# Altium PCB Knob-v1.0.PcbDoc (part 2 of 3)
Units mil, origin at the board's own origin, x right, y up, seen from the top; angles counter-clockwise.
Board outline 3346.46 x 5475.65 mil, 2 copper layers (Top Layer, Bottom Layer), stack 61.811 mil thick; 109 components, 69 nets, 369 pads, 208 vias.
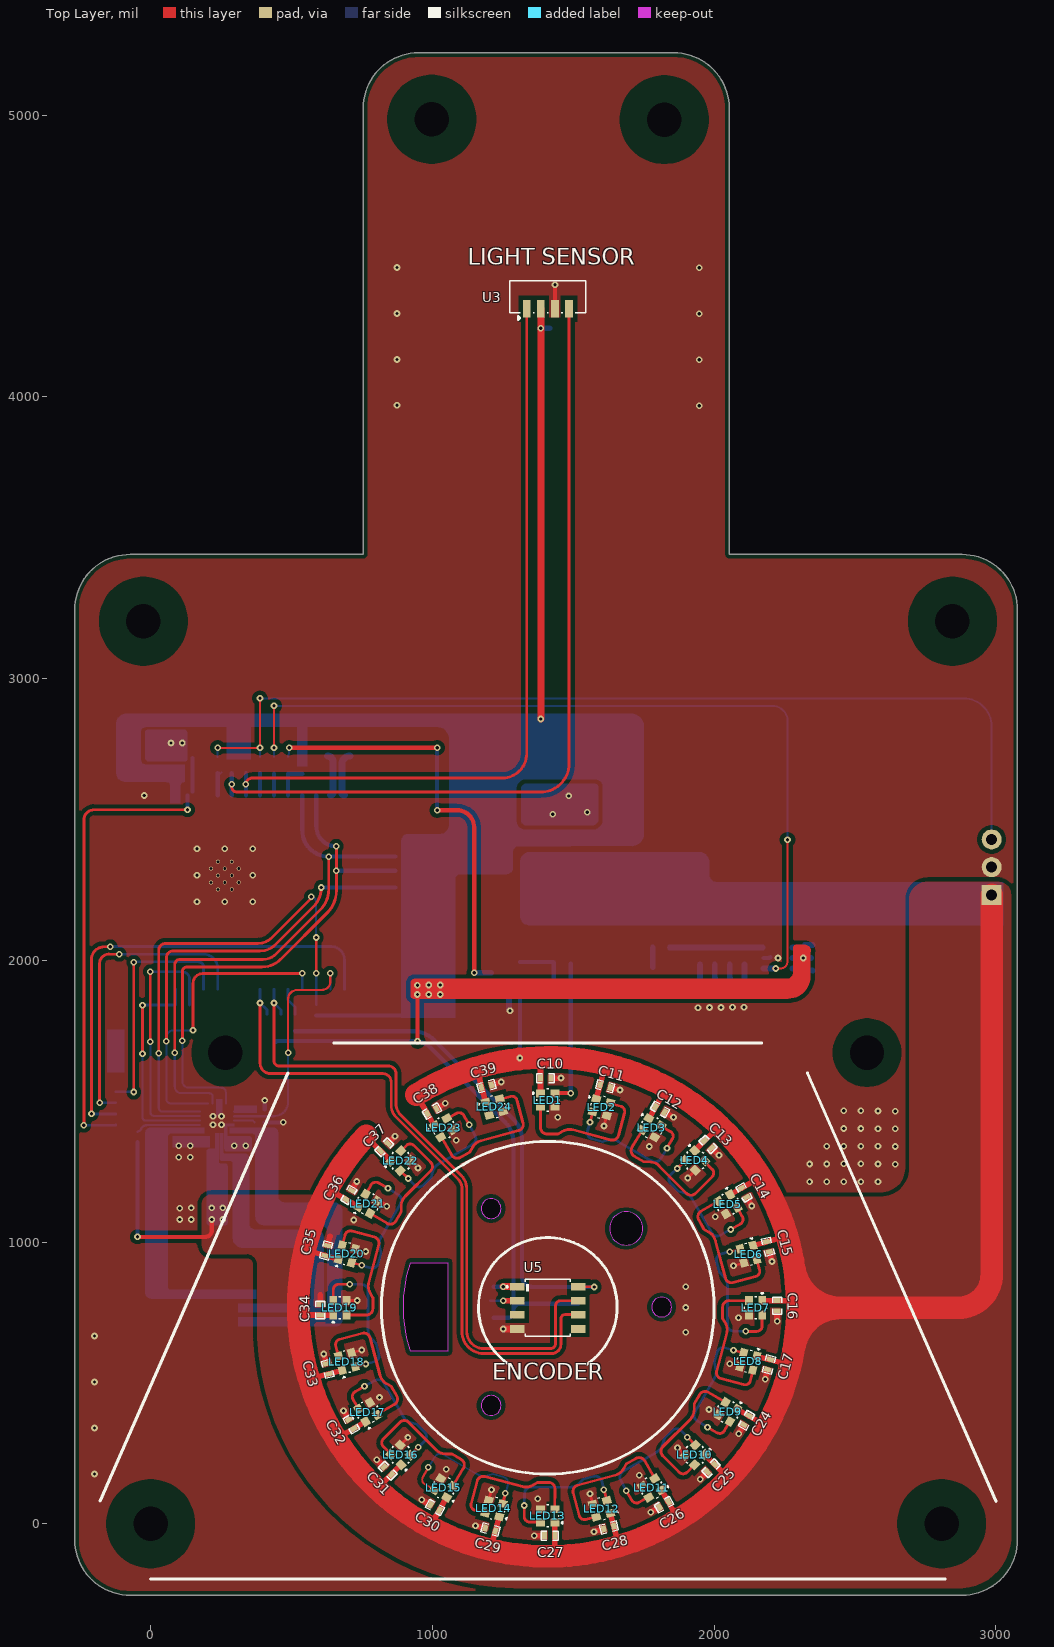
[diagram p0: Top Layer view]

## Via types
v1: diameter 23.62, hole 11.81, Top Layer to Bottom Layer, tented both sides, 208 vias

## Nets (pads, with @x,y where several pads share a name; then routed paths per layer and width w, separated by ;. In a path a pad name is that pad's centre, name@x,y a point inside that pad or via, vN(x,y) a via of type N, cw(c..) or ccw(c..) an arc to the next point about the centre after c; other vN are vias at no path point) (continued)
3V3: (continued)
  Bottom Layer w15: 445.27,1711.18 cw(c448.08,1711.18) 448.08,1713.99 935.21,1713.99 cw(c935.21,1631.23) 993.73,1689.75 1258.73,1424.75 cw(c1188.02,1354.04) 1288.02,1354.04 1288.02,821.41 ; R6.1@588.11,1804 910,1804 912,1806 ; R18.1@1218.01,731.41 1270.58,731.41 ccw(c1270.58,748.85) 1288.02,748.85 1288.02,826.41 ccw(c1273.02,826.41) 1273.02,841.41 ; C19.2@1218.01,841.41 v1(1251.42,841.41) 1273.02,841.41 ; 1288.02,758.27 cw(c1310.27,758.27) 1310.27,780.52 ; 1288.02,802.78 ccw(c1310.27,802.78) 1310.27,780.52 ; 1288.02,856.41 cw(c1273.02,856.41) 1273.02,841.41 ; R20.1@1518.32,780.52 1310.27,780.52
  Bottom Layer w20: v1(1385.28,4244.16) C8.2@1416.07,4244.16 ; U7.5@2278.66,2008.09 2311.42,2008.09 C40.1@2344.17,2008.09
  other v1: 987.89,1878.86 1028.64,1878.86 947.14,1911.61 987.89,1912.2 1028.64,1912.2 2316.42,2008.09 1385.28,2856.38
5V: C1.2 C2.2 C9.2 C10.2 C11.2 C12.2 C13.2 C14.2 C15.2 C16.2 C17.2 C18.2 C20.2 C21.2 C24.2 C25.2 C26.2 C27.2 C28.2 C29.2 C30.2 C31.2 C32.2 C33.2 C34.2 C35.2 C36.2 C37.2 C38.2 C39.2 J1.1 LED1.1 LED2.1 LED3.1 LED4.1 LED5.1 LED6.1 LED7.1 LED8.1 LED9.1 LED10.1 LED11.1 LED12.1 LED13.1 LED14.1 LED15.1 LED16.1 LED17.1 LED18.1 LED19.1 LED20.1 LED21.1 LED22.1 LED23.1 LED24.1 U1.3 U4.5 U6.18 | length 11509.7
  Top Layer w10: 1384.27,1633.68 1388.13,1637.55 1391.58,1641
  Top Layer w15: v1(-46.68,1018.16) 194.27,1018.16 ccw(c194.27,1041.16) 217.27,1041.16 v1(217.27,1079.65)
  Top Layer w20: 529.86,740.94 600.73,740.94 602.15,740.94 LED19.1@648.3,740.94 ; 552.9,969.89 618.43,952.33 621.35,951.55 LED20.1@667.29,939.24 ; 560.81,517.12 562.74,517.64 ; 566.14,514.26 633.69,532.36 634.59,532.6 LED18.1@680.54,544.91 ; 635.28,1184.69 694.46,1150.53 696.66,1149.26 LED21.1@737.85,1125.48 ; 654.76,306.54 655.44,306.94 ; 660.5,303 721.51,338.23 721.87,338.44 LED17.1@763.07,362.22 ; 768.7,1370.74 C37.2@816.01,1323.45 818.81,1320.63 LED22.1@852.45,1286.99 ; 805.3,125.79 854.85,175.34 855.41,175.9 LED16.1@889.04,209.53 ; 947.6,1515.74 982.47,1455.34 983.03,1454.37 LED23.1@1006.81,1413.17 ; 991.73,-8.95 1025.02,48.72 1027.16,52.42 LED15.1@1050.94,93.61 ; 1158.74,1610.07 1175.14,1548.83 1177.08,1541.61 LED24.1@1189.39,1495.67 ; 1206.89,-89.7 C29.2@1224.12,-25.49 1225.23,-21.25 LED14.1@1237.54,24.69 ; LED1.1@1384.27,1527.56 1384.27,1575.13 1384.27,1581.82 1384.27,1645.99 ; 1388.13,1637.55 1388.13,1645.99 ; 1435.14,-114.24 1435.14,-43.37 LED13.1@1435.14,4.19 ; LED2.1@1582.22,1507.79 1594.53,1553.73 1595.68,1558.03 1612.87,1622.18 ; LED12.1@1631.66,36.96 1643.97,-8.99 1643.99,-9.07 1662.31,-77.44 ; LED3.1@1768.63,1438.76 1792.35,1479.86 1792.41,1479.96 1827.84,1541.33 ; LED11.1@1812.95,119.31 1836.73,78.11 1837.55,76.7 1872.17,16.74 ; LED4.1@1931.13,1324.17 1964.76,1357.8 1966.1,1359.14 2014.87,1407.91 ; LED10.1@1966.93,245.71 2000.56,212.08 2002.72,209.92 2050.67,161.97 ; LED5.1@2057.31,1167.83 2097.55,1191.07 2098.5,1191.61 2159.87,1227.05 ; LED9.1@2081.91,407 2123.11,383.22 2124.29,382.54 2184.48,347.79 ; LED6.1@2138.67,987.53 2184.62,999.84 2186.78,1000.42 2253.07,1018.18 ; LED8.1@2151.35,595.05 2197.29,582.74 2199.92,582.04 2265.74,564.4 ; LED7.1@2171.23,792 2272.26,792
  Top Layer w80: 765.84,1377.87 ccw(c1409.88,769.67) 560.81,517.12 ccw(c1409.88,769.67) 654.76,306.54 ccw(c1409.88,769.67) 797.56,129.55 ccw(c1409.88,769.67) 986.82,-8.61 ccw(c1409.88,769.67) 1202.49,-91.54 ccw(c1409.88,769.67) 1428.36,-115.97 ccw(c1409.88,769.67) 1657.34,-80.89 ccw(c1409.88,769.67) 2050.08,157.44 ccw(c1409.88,769.67) 2184.52,339.99 ccw(c1409.88,769.67) 2269.41,555.43 ccw(c1409.88,769.67) 2295.7,766.41 ccw(c1409.88,769.67) 2292.38,846.33 cw(c2389.63,865.54) 2290.5,865.54 ccw(c1409.88,769.67) 2285.91,901 ; 943.29,1522.66 cw(c1409.88,769.67) 2285.91,901 ; 2285.91,631.14 cw(c2450.11,598.7) 2449.98,766.07 cw(c2450.11,933.45) 2285.91,901 ; 2446.72,766.41 2867.32,766.41 ; 2867.62,766.41 ccw(c2867.62,884.47) 2985.67,884.47 J1.1@2985.67,2232.36
  Bottom Layer w15: v1(-46.68,1018.16) -46.25,1018.16 C18.2@-46.25,1354.21 ; v1(1311.01,1653.12) C9.2@1311.01,1870.16 U4.5@1311.01,1913.76
  other v1: 256.31,1079.65 217.27,1120.98 256.31,1120.98
BLDC_U: J3.3 U6.15
BLDC_V: J3.2 U6.17
BLDC_W: J3.1 U6.1
ENC_CLK: R3.1 U2.20 U5.7 | length 2359.1
  Top Layer w10: v1(438.16,1848.68) 438.16,1642.84 ccw(c456,1642.84) 456,1625 843.89,1625 cw(c843.89,1597.89) 871,1597.89 871,1491.89 ccw(c928.87,1491.89) 887.95,1450.97 1052.85,1286.07 1102.77,1236.14 cw(c1055.57,1188.91) 1122.35,1188.91 1122.35,681.76 ccw(c1182.38,681.76) 1182.38,621.73 1420.01,621.73 ccw(c1420.01,639.08) 1437.36,639.08 1437.36,773.87 cw(c1454.91,773.87) 1454.91,791.41 U5.7@1518.12,791.41
  Bottom Layer w10: v1(438.16,1848.68) 463.03,1823.81 R3.1@463.03,1808.31 ; v1@438.16,1852.77 U2.20@438.16,1897.22
ENC_CSN: R19.2 R20.2 U5.8 | length 1808.1
  Top Layer w10: U5.8@1511.12,841.41 1511.57,840.97 1574.77,840.97 v1(1575.22,840.52)
  Bottom Layer w15: R19.2@513.02,1748.35 929.04,1748.35 929.13,1748.35 cw(c929.09,1637.21) 1007.73,1715.75 1289.03,1434.45 cw(c1218.32,1363.74) 1318.32,1363.74 1318.32,878.35 ccw(c1356.15,878.35) 1356.15,840.52 R20.2@1518.32,840.52 v1(1575.22,840.52)
ENC_DO: R9.1 U2.21 U5.6 | length 2378
  Top Layer w10: v1(388.53,1848.68) 388.53,1634.81 ccw(c425.45,1634.81) 425.45,1597.89 824.09,1597.89 cw(c824.09,1567.98) 854,1567.98 854,1484.85 ccw(c911.87,1484.85) 870.95,1443.93 ; 870.95,1443.93 1090.81,1224.07 cw(c1055.48,1188.87) 1105.35,1188.9 1105.35,1188.82 1105.35,681.24 ; 1105.35,681.19 ccw(c1182.38,681.19) 1182.38,604.16 1182.45,604.16 1423.92,604.16 ccw(c1423.92,636.67) 1456.43,636.67 1456.43,727.48 cw(c1471.11,727.48) 1471.11,742.16 1517.38,742.16 cw(c1517.38,741.41) U5.6@1518.12,741.41
  Bottom Layer w10: v1@387.84,1848.68 387.84,1897.22 U2.21@388.16,1897.22 ; v1(388.53,1848.68) 412.84,1824.37 R9.1@412.84,1808.31
ESP_EN: C7.2 J2.6 R7.1 U2.3 | length 1757.9
  Top Layer w10: v1(-237,1414) -237,2497.99 cw(c-200.54,2497.99) -200.54,2534.45 v1(131.16,2534.45)
  Bottom Layer w10: v1@-237,1414.68 -124.26,1414.68 J2.6@-123.58,1415.35
  Bottom Layer w13: U2.3@148.84,2597.98 R7.1@148.84,2664.98 C7.2@148.84,2718.48
  Bottom Layer w15: v1(131.16,2534.45) U2.3@131.16,2585.2
ESP_IO9: J2.5 U2.15 | length 1690.7
  Top Layer w10: v1(-210.04,1454.72) -210.04,2002.96 cw(c-164.89,2002.96) -164.89,2048.11 v1(-143.31,2048.11)
  Bottom Layer w10: v1(-210.04,1454.72) J2.5@-123.58,1454.72 ; v1(-143.31,2048.11) cw(c-142.41,2048.11) -142.41,2049 606.07,2049 641,2049 cw(c641,2001.84) 685.36,2017.84 cw(c641,2001.84) 688.11,2003.97 cw(c641,2001.84) 688.16,2001.84 U2.15@688.16,1897.22
GND: C1.1 C2.1 C3.1 C4.1 C5.1 C6.1 C7.1 C8.1 C9.1 C10.1 C11.1 C12.1 C13.1 C14.1 C15.1 C16.1 C17.1 C19.1 C20.1 C21.1 C22.1 C23.1 C24.1 C25.1 C26.1 C27.1 C28.1 C29.1 C30.1 C31.1 C32.1 C33.1 C34.1 C35.1 C36.1 C37.1 C38.1 C39.1 C40.2 C41.1 C42.1 C43.1 C44.1 J1.2 J2.2 J2.MP1 J2.MP2 J3.SH1 J3.SH2 J4.SH1 J4.SH2 LED1.3 LED2.3 LED3.3 LED4.3 LED5.3 LED6.3 LED7.3 LED8.3 LED9.3 LED10.3 LED11.3 LED12.3 LED13.3 LED14.3 LED15.3 LED16.3 LED17.3 LED18.3 LED19.3 LED20.3 LED21.3 LED22.3 LED23.3 LED24.3 R22.2 R23.1 U1.1 U2.1 U2.28 U2.29_1 U2.29_2 U2.29_3 U2.29_4 U2.29_5 U2.29_6 U2.29_7 U2.29_8 U2.29_9 U2.30_1 U2.30_2 U2.30_3 U2.30_4 U2.30_5 U2.30_6 U2.30_7 U2.30_8 U2.30_9 U2.30_10 U2.30_11 U2.30_12 U3.3 U4.3 U5.4 U6.8 U6.9 U6.14 U6.16 U6.20 U6.21 U7.2 | length 1531.9
  Top Layer w10: LED19.3@695.54,792.12 v1(733.94,792.12) ; LED18.3@712.93,606.58 v1(750.02,616.52) ; LED20.3@726.17,976.45 v1(763.26,966.51) ; LED16.3@886.26,279.13 v1(913.41,306.28) ; LED22.3@922.04,1289.78 v1(949.19,1262.63) ; C38.1@1014.42,1473.79 C38.1@1017.89,1475.79 ; v1@1043.8,1490.74 1044.87,1490.74 v1@1045.18,1490.66 ; LED14.3@1200.33,83.57 v1(1210.27,120.66) ; v1(1560.06,106.43) LED12.3@1569.99,69.34 ; v1(1609.5,1411.82) LED2.3@1619.43,1448.91 ; v1(1870.18,270.08) LED10.3@1897.33,242.93 ; v1(1906.76,1227.42) LED4.3@1933.91,1254.57 ; v1(2055.38,567.78) LED8.3@2092.46,557.84 ; v1(2069.2,915.92) LED6.3@2106.29,925.86
  Top Layer w15: U3.3@1435.28,4313.31 v1(1435.28,4398.16)
  Top Layer w20: C34.1@602.15,781.78 602.15,811.7 ; v1@615.46,600.41 C33.1@623.21,571.51 ; C35.1@628.85,991.23 636.6,1020.13 ; v1@686.24,399.3 C32.1@701.2,373.39 ; C36.1@715.36,1186.73 v1@730.32,1212.64 ; LED21.3@804.5,1145.85 v1(837.75,1126.65) ; v1@804.95,225.24 C31.1@826.11,204.08 ; C37.1@845,1352.45 v1@866.16,1373.6 ; v1@964.27,83.8 C30.1@990.18,68.84 ; C38.1@1017.89,1475.79 v1@1043.8,1490.74 ; v1@1155.62,-7.13 C29.1@1184.52,-14.88 ; C39.1@1213.98,1559.23 v1@1242.87,1566.98 ; v1@1364.44,-42.69 C27.1@1394.36,-42.69 ; C10.1@1424.58,1581.82 v1@1454.5,1581.82 ; v1@1575.9,-27.32 C28.1@1604.79,-19.57 ; C11.1@1635.26,1547.42 v1@1664.16,1539.68 ; v1@1777.01,41.75 C26.1@1802.92,56.71 ; C12.1@1827.96,1459.3 v1@1853.87,1444.34 ; v1@1952.65,159.85 C25.1@1973.81,181 ; C13.1@1994.61,1330.63 v1@2015.77,1309.47 ; v1@2089.29,321.91 C24.1@2104.24,347.82 ; C14.1@2117.94,1155.76 v1@2132.89,1129.85 ; v1@2181.81,514.45 C17.1@2189.55,543.35 ; C15.1@2197.17,961.64 v1@2204.91,932.75 ; v1@2223.86,721.3 C16.1@2223.86,751.22
  Top Layer w25: v1(1251.42,691.41) U5.4@1301.59,691.41
  Bottom Layer w15: C23.1@405.2,1424.26 470.04,1424.26 ccw(c470.04,1425.2) v1(470.98,1425.2) ; C22.1@405.2,1470.4 v1(405.2,1502.61) ; U7.2@2175.51,2008.09 2197.04,2008.09 2199.53,2010.58
  Bottom Layer w20: C9.1@1272.26,1870.16 1272.26,1824.74 v1(1276,1821)
  other v1: 1362.18,-42.95 1573.78,-28.15 1153.37,-6.8 1775.19,40.39 962.18,84.7 1374.02,88.53 1951.24,158.06 1735.06,171.72 -199.11,176.62 1049.44,193.37 803.17,226.65 2088.38,319.82 -199.11,339.82 684.89,401.13 1982.16,405.5 812.66,448.27 -199.11,503.02 2181.48,512.2 614.62,602.52 -199.11,666.22 1900.04,679.13 2224.12,719.04 2086.9,730.88 1900.04,767.48 1900.04,841.39 2205.75,930.63 720.93,1078.37 103.59,1079.65 144.33,1079.65 2004.9,1089.95 103.59,1120.39 144.33,1120.98 2134.25,1128.02 2339.27,1213.94 2400.02,1213.94 2460.77,1213.94 2521.52,1213.94 2582.26,1213.94 731.22,1214.73 2643.01,1276.1 2339.27,1276.69 2400.02,1276.69 2460.77,1277.28 2521.52,1277.28 2582.26,1276.69 99.55,1300.79 140.3,1300.79 2017.55,1308.06 1770.13,1339.01 2400.02,1339.44 2582.26,1339.44 2643.01,1338.85 2460.77,1340.03 2521.52,1340.03 99.55,1341.54 140.3,1341.54 296.69,1341.54 337.44,1341.54 1084.7,1360.76 867.57,1375.39 2643.01,1401.59 2582.26,1402.19 2460.77,1402.78 2521.52,1402.78 221.72,1416.69 251.47,1416.69 1445.39,1443.23 1855.96,1443.44 221.72,1446.44 251.47,1446.44 2643.01,1464.34 2460.77,1465.52 2521.52,1465.52 2582.26,1464.93 1045.63,1492.1 1666.41,1539.34 1244.99,1567.82 1456.76,1582.08 1943.44,1831.85 1984.19,1832.45 2024.94,1832.45 2065.68,1833.04 2106.43,1833.04 2227.04,2008.09 164.45,2207.37 263.24,2207.37 362.02,2207.37 164.45,2301.62 362.02,2301.62 164.45,2395.87 263.24,2395.87 362.02,2395.87 1428,2519 1550.32,2525.82 1484.41,2583.57 -22.59,2585.2 72.13,2771.55 111.84,2771.55 1947.28,3968.88 874.37,3969.86 1947.28,4132.08 874.37,4133.06 1947.28,4295.28 874.37,4296.26 1947.28,4458.48 874.37,4459.46
LED_D: LED8.2 LED9.4 | length 526.1
  Top Layer w10: v1(1976.94,342.33) 2010.19,323.13 ccw(c2020.34,340.5) 2025.58,321.08 ccw(c2020.78,338.87) 2036.74,329.66 LED9.4@2055.93,362.91 ; v1(2069.36,615.63) LED8.2@2106.45,605.69
  Bottom Layer w10: v1(1976.94,342.33) 1940.11,365.11 cw(c1951.48,384.31) 1932.18,395.49 2001.18,515.01 ccw(c1958.9,539.42) 2005.82,552.91 2000.78,571.73 2011.08,608.78 cw(c2032.66,602.97) 2038.21,624.62 v1@2069.45,615.95
LED_D0: LED16.2 LED17.4 | length 526.1
  Top Layer w10: LED17.4@737.53,409.24 718.33,442.49 cw(c734.29,451.7) 716.48,456.44 cw(c735.92,451.26) 725.96,468.74 v1(759.21,487.94) ; LED16.2@922.53,244.1 v1(949.68,271.25)
  Bottom Layer w10: v1(759.21,487.94) 797.35,508.44 cw(c808.29,488.99) 827.63,500.12 896.63,380.6 ccw(c938.91,405.01) 927.13,357.63 945.95,352.59 972.89,325.14 cw(c957.07,309.36) 973.05,293.73 ; v1@949.92,271.01 973.05,293.74
LED_DO_3V3: R29.1 U4.2 | length 1524.2
  Top Layer w15: v1(491.77,2754.94) 1013.06,2754.94 v1@1017,2751 ; v1(1017,2533) 1087,2533 cw(c1087,2471.19) 1148.81,2471.19 v1(1148.81,1956.23)
  Bottom Layer w7: R29.1@488.16,2722 491.77,2733.5 v1(491.77,2754.94)
  Bottom Layer w8: v1(1148.81,1956.23) v1@1148.88,1956.16
  Bottom Layer w15: v1(1017,2533) v1(1017,2754.94)
  Bottom Layer w20: v1@1148.88,1956.16 U4.2@1208.65,1956.16
LED_DO_5V0: R16.1 R17.1 U4.4 | length 178.4
  Bottom Layer w15: U4.4@1311.01,1993.56 R17.1@1430.38,1993.56 ; R16.1@1430.95,1933.93 R17.1@1430.95,1992.99
NetC18_1: C18.1 U6.2 | length 230
  Bottom Layer w8.5: C18.1@-46.25,1391.21 -38,1395.96 -31.02,1405.44 cw(c-11.68,1391.21) -11.68,1415.22 U6.2@174.52,1415.22
NetC23_2: C23.2 U6.13 | length 75.1
  Bottom Layer w7: U6.13@296.69,1431.1 362.7,1431.1 368.2,1425.6 C23.2@368.2,1424.26
NetC41_2: C41.2 R25.1 | length 48.1
  Bottom Layer w20: R25.1@1950.33,1984.89 1950.33,1937.62 C41.2@1950.93,1937.02
NetC42_2: C42.2 R26.1 | length 48.6
  Bottom Layer w20: R26.1@2003,1984.89 2003,1938.69 C42.2@2004.67,1937.02
NetC43_2: C43.2 R27.1 | length 48.3
  Bottom Layer w20: R27.1@2055.66,1984.89 2055.66,1938.03 C43.2@2056.67,1937.02
NetC44_2: C44.2 R28.1 | length 46.9
  Bottom Layer w20: R28.1@2108.33,1984.89 2108.33,1938.81 C44.2@2108.93,1938.21
NetJ2_1: J2.1 R1.1
NetLED1_2: LED1.2 LED2.4 | length 528
  Top Layer w10: LED1.2@1384.49,1476.65 1384.41,1466.64 1383.88,1406.47 ccw(c1390.88,1406.45) 1383.88,1406.4 1383.88,1406.34 ccw(c1407.08,1406.69) 1407.05,1383.49 1445.51,1383.13 1462.39,1392.88 cw(c1487.56,1351.04) 1500.19,1398.2 1633.5,1362.48 ccw(c1639.31,1384.03) 1660.79,1378.01 1682.21,1457.98 1682.23,1458.03 ccw(c1662.82,1463.34) 1680.23,1473.43 ccw(c1664.29,1464.19) 1669.05,1481.99 LED2.4@1631.97,1491.92
NetLED1_4: LED1.4 R16.2 R17.2 | length 514.1
  Top Layer w10: LED1.4@1435.45,1527.56 LED1.4@1436.43,1528.54
  Top Layer w15: LED1.4@1436.43,1528.54 v1(1491.32,1528.54)
  Bottom Layer w15: v1@1491.32,1530.16 R17.2@1491.32,1987.92
NetLED2_2: LED2.2 LED3.4 | length 526.1
  Top Layer w10: v1(1559.8,1424.72) LED2.2@1569.74,1461.81 ; LED3.4@1812.53,1411.29 1845.78,1392.1 cw(c1836.57,1376.14) 1854.36,1380.94 cw(c1834.93,1375.7) 1852.3,1365.55 v1(1833.11,1332.3)
  Bottom Layer w10: v1@1559.48,1424.81 1550.82,1393.56 ccw(c1572.46,1388.02) 1566.65,1366.44 1603.71,1356.14 1622.53,1361.18 cw(c1636.02,1314.26) 1660.43,1356.54 1779.95,1287.53 ccw(c1791.13,1306.84) 1810.32,1295.47 v1(1833.11,1332.3)
NetLED3_2: LED3.2 LED4.4 | length 528
  Top Layer w10: LED3.2@1744.33,1396.07 1739.24,1387.44 1708.71,1335.6 ccw(c1714.75,1332.07) 1708.67,1335.54 1708.64,1335.48 ccw(c1728.91,1324.19) 1717.28,1304.11 1750.41,1284.57 1769.89,1284.57 cw(c1770.78,1235.76) 1805.3,1270.28 1902.89,1172.69 ccw(c1918.68,1188.45) 1934.28,1172.5 1992.82,1231.04 1992.86,1231.08 ccw(c1978.71,1245.38) 1998.83,1245.41 ccw(c1980.4,1245.38) 1993.43,1258.41 LED4.4@1966.28,1285.56
NetLED4_2: LED4.2 LED5.4 | length 526.1
  Top Layer w10: v1(1869.53,1261.19) LED4.2@1896.68,1288.34 ; v1(2060.01,1044.5) 2093.26,1063.7 ccw(c2083.29,1081.18) 2102.73,1076 ccw(c2084.93,1080.74) 2100.88,1089.95 LED5.4@2081.68,1123.2
  Bottom Layer w10: v1@1869.29,1261.43 1846.17,1238.7 ccw(c1862.15,1223.08) 1846.32,1207.29 1873.26,1179.85 1892.08,1174.8 cw(c1880.3,1127.43) 1922.58,1151.84 1991.59,1032.32 ccw(c2010.93,1043.45) 2021.86,1024 v1(2060.01,1044.5)